# Altium PCB BOARD_4LAYER.PcbDoc (part 20 of 21)
Units mil, origin at the board's own origin, x right, y up, seen from the top; angles counter-clockwise.
Board outline 6692.91 x 10039.37 mil, 4 copper layers (Top Layer, Mid Layer 1, Mid Layer 2, Bottom Layer), stack 66.299 mil thick; 1532 components, 908 nets, 4105 pads, 1286 vias.
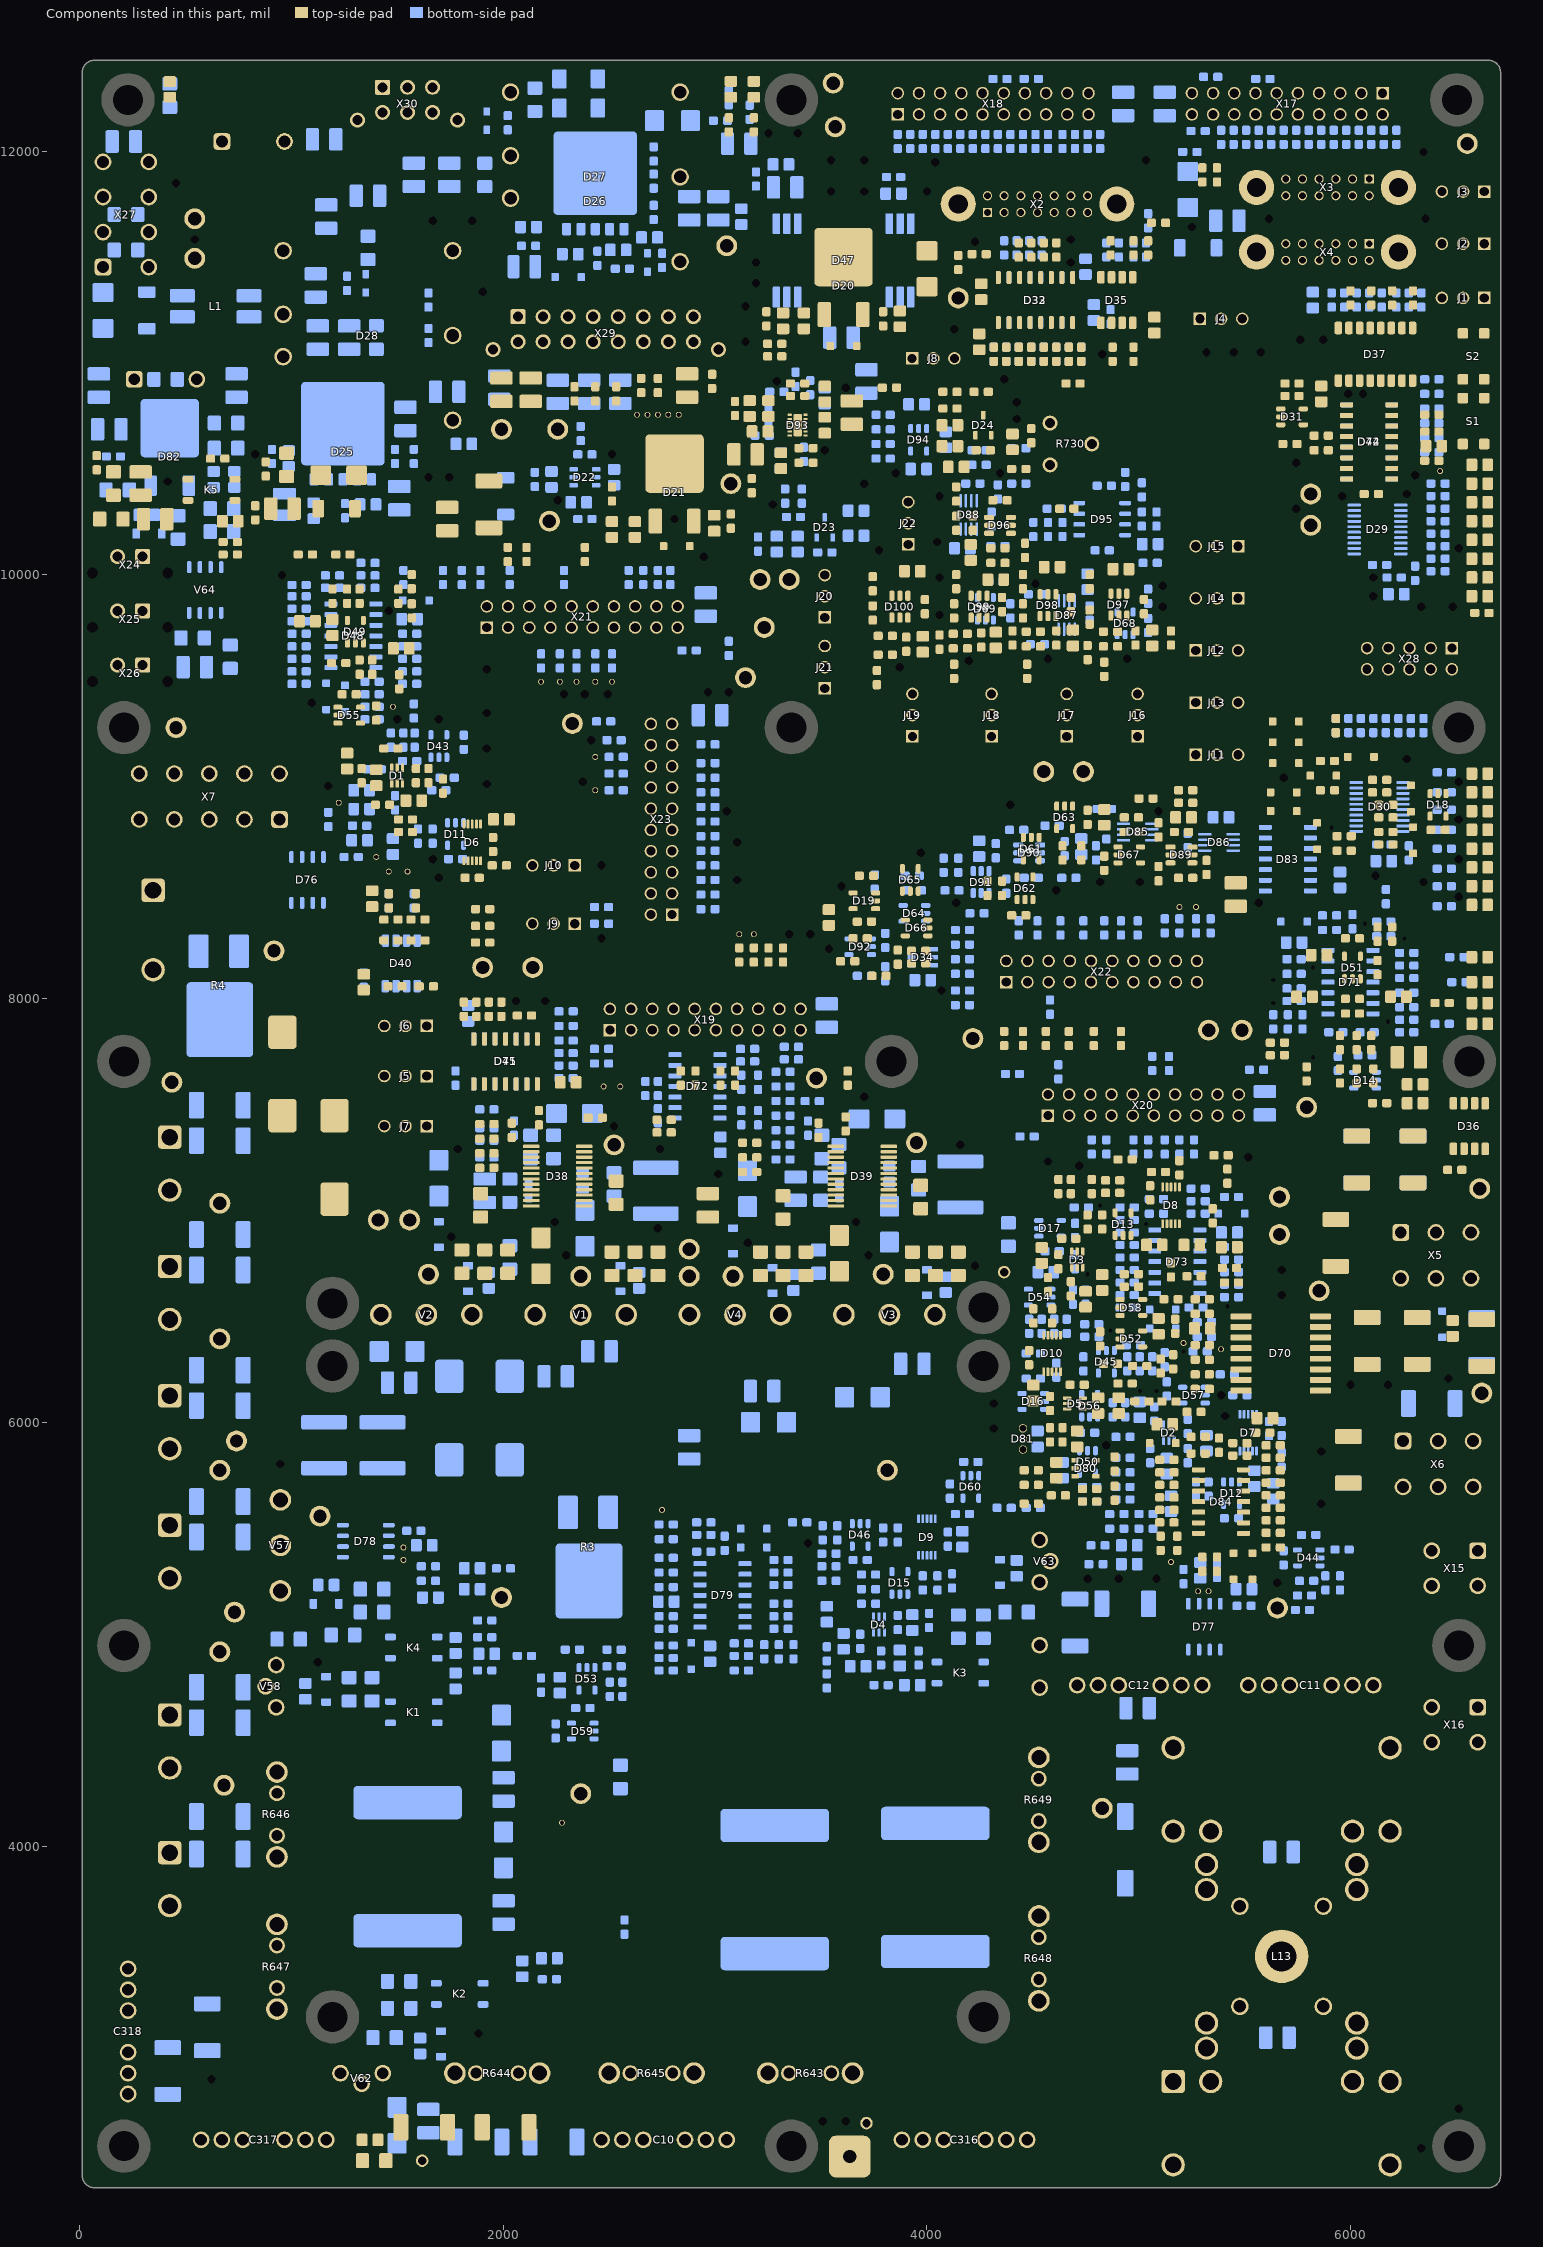
[diagram p22: the components of this part, seen from the top]

## Silkscreen, mask and mechanical layers (free items; w line width, h text height) (continued)
Drill Drawing:
  lines w4.72: 3.94,1657.48 4870.08,1657.48 ; 3.94,1846.46 4870.08,1846.46 ; 3.94,3.94 3.94,2035.43 4870.08,2035.43 4870.08,3.94 3.94,3.94
  text "A" at 375.98,12322.83 h78.74
  text "A" at 3127.95,12318.9 h78.74
  text "K" at 3557.09,12281.5 h78.74
  text "F" at 1431.1,12261.81 h78.74
  text "F" at 1549.21,12261.81 h78.74
  text "F" at 1667.32,12261.81 h78.74
  text "A" at 482.28,12255.91 h78.74
  text "A" at 3021.65,12251.97 h78.74
  text "J" at 2035.04,12238.58 h78.74
  text "J" at 2835.04,12238.58 h78.74
  text "E" at 3862.2,12233.86 h78.74
  text "E" at 3962.2,12233.86 h78.74
  text "E" at 4062.2,12233.86 h78.74
  text "E" at 4162.2,12233.86 h78.74
  text "E" at 4262.2,12233.86 h78.74
  text "E" at 4362.2,12233.86 h78.74
  text "E" at 4462.2,12233.86 h78.74
  text "E" at 4562.2,12233.86 h78.74
  text "E" at 4662.2,12233.86 h78.74
  text "E" at 4762.2,12233.86 h78.74
  text "E" at 5250,12233.86 h78.74
  text "E" at 5350,12233.86 h78.74
  text "E" at 5450,12233.86 h78.74
  text "E" at 5550,12233.86 h78.74
  text "E" at 5650,12233.86 h78.74
  text "E" at 5750,12233.86 h78.74
  text "E" at 5850,12233.86 h78.74
  text "E" at 5950,12233.86 h78.74
  text "E" at 6050,12233.86 h78.74
  text "E" at 6150,12233.86 h78.74
  text "A" at 3127.95,12208.66 h78.74
  text "P" at 230.31,12202.76 h78.74
  text "P" at 3360.24,12202.76 h78.74
  text "P" at 6500,12202.76 h78.74
  text "F" at 1431.1,12143.7 h78.74
  text "F" at 1549.21,12143.7 h78.74
  text "F" at 1667.32,12143.7 h78.74
  text "E" at 3862.2,12133.86 h78.74
  text "E" at 3962.2,12133.86 h78.74
  text "E" at 4062.2,12133.86 h78.74
  text "E" at 4162.2,12133.86 h78.74
  text "E" at 4262.2,12133.86 h78.74
  text "E" at 4362.2,12133.86 h78.74
  text "E" at 4462.2,12133.86 h78.74
  text "E" at 4562.2,12133.86 h78.74
  text "E" at 4662.2,12133.86 h78.74
  text "E" at 4762.2,12133.86 h78.74
  text "E" at 5250,12133.86 h78.74
  text "E" at 5350,12133.86 h78.74
  text "E" at 5450,12133.86 h78.74
  text "E" at 5550,12133.86 h78.74
  text "E" at 5650,12133.86 h78.74
  text "E" at 5750,12133.86 h78.74
  text "E" at 5850,12133.86 h78.74
  text "E" at 5950,12133.86 h78.74
  text "E" at 6050,12133.86 h78.74
  text "E" at 6150,12133.86 h78.74
  text "A" at 427.17,12110.24 h78.74
  text "F" at 1312.99,12106.69 h78.74
  text "F" at 1785.43,12106.69 h78.74
  text "A" at 6647.64,12098.43 h78.74
  text "K" at 3566.93,12074.8 h78.74
  text "A" at 899.61,12059.06 h78.74
  text "A" at 746.06,12055.12 h78.74
  text "A" at 6647.64,12051.18 h78.74
  text "T" at 3251.97,12045.28 h78.74
  text "T" at 3389.76,12045.28 h78.74
  text "A" at 2257.87,12035.43 h78.74
  text "A" at 2312.99,12035.43 h78.74
  text "A" at 2375.98,12035.43 h78.74
  text "A" at 2454.72,12035.43 h78.74
  text "A" at 2529.53,12035.43 h78.74
  text "A" at 2608.27,12035.43 h78.74
  text "H" at 673.23,12005.91 h78.74
  text "H" at 968.5,12005.91 h78.74
  text "K" at 6549.21,11996.06 h78.74
  text "A" at 2096.46,11976.38 h78.74
  text "A" at 899.61,11964.57 h78.74
  text "A" at 2257.87,11964.57 h78.74
  text "A" at 2312.99,11964.57 h78.74
  text "A" at 2375.98,11964.57 h78.74
  text "A" at 2454.72,11964.57 h78.74
  text "A" at 2529.53,11964.57 h78.74
  text "A" at 2608.27,11964.57 h78.74
  text "A" at 5316.93,11960.63 h78.74
  text "T" at 6342.52,11956.69 h78.74
  text "A" at 5923.23,11948.82 h78.74
  text "A" at 5978.35,11948.82 h78.74
  text "A" at 6037.4,11948.82 h78.74
  text "A" at 6096.46,11948.82 h78.74
  text "A" at 6155.51,11948.82 h78.74
  text "A" at 6214.57,11948.82 h78.74
  text "A" at 5391.73,11944.88 h78.74
  text "A" at 5450.79,11944.88 h78.74
  text "A" at 5509.84,11944.88 h78.74
  text "A" at 5564.96,11944.88 h78.74
  text "A" at 5624.02,11944.88 h78.74
  text "A" at 5742.13,11944.88 h78.74
  text "J" at 2035.04,11938.58 h78.74
  text "A" at 4698.82,11929.13 h78.74
  text "A" at 4816.93,11929.13 h78.74
  text "A" at 4525.59,11925.2 h78.74
  text "A" at 4643.7,11925.2 h78.74
  text "T" at 3547.24,11917.32 h78.74
  text "T" at 3704.72,11917.32 h78.74
  text "T" at 5033.46,11917.32 h78.74
  text "H" at 112.2,11909.45 h78.74
  text "H" at 328.74,11909.45 h78.74
  text "T" at 4039.37,11907.48 h78.74
  text "A" at 2096.46,11901.57 h78.74
  text "A" at 2257.87,11897.64 h78.74
  text "A" at 2312.99,11897.64 h78.74
  text "A" at 2375.98,11897.64 h78.74
  text "A" at 2454.72,11897.64 h78.74
  text "A" at 2529.53,11897.64 h78.74
  text "A" at 2608.27,11897.64 h78.74
  text "A" at 3399.61,11895.67 h78.74
  text "A" at 3005.91,11877.95 h78.74
  text "J" at 2835.04,11838.58 h78.74
  text "C" at 5692.91,11828.74 h78.74
  text "C" at 5771.65,11828.74 h78.74
  text "C" at 5850.39,11828.74 h78.74
  text "C" at 5929.13,11828.74 h78.74
  text "C" at 6007.87,11828.74 h78.74
  text "C" at 6086.61,11828.74 h78.74
  text "A" at 2903.54,11826.77 h78.74
  text "A" at 2257.87,11822.83 h78.74
  text "A" at 2312.99,11822.83 h78.74
  text "A" at 2375.98,11822.83 h78.74
  text "A" at 2454.72,11822.83 h78.74
  text "A" at 2529.53,11818.9 h78.74
  text "A" at 2608.27,11818.9 h78.74
  text "T" at 456.69,11809.06 h78.74
  text "N" at 5555.12,11789.37 h78.74
  text "N" at 6224.41,11789.37 h78.74
  text "A" at 2753.94,11787.4 h78.74
  text "A" at 2096.46,11775.59 h78.74
  text "A" at 3108.27,11775.59 h78.74
  text "A" at 5328.74,11771.65 h78.74
  text "A" at 5368.11,11771.65 h78.74
  text "T" at 3547.24,11769.68 h78.74
  text "T" at 3704.72,11769.68 h78.74
  text "T" at 4000,11769.68 h78.74
  text "E" at 6429.53,11769.68 h78.74
  text "E" at 6529.53,11769.68 h78.74
  text "E" at 6629.53,11769.68 h78.74
  text "A" at 2529.53,11751.97 h78.74
  text "A" at 2608.27,11751.97 h78.74
  text "C" at 4285.43,11750 h78.74
  text "C" at 4364.17,11750 h78.74
  text "C" at 4442.91,11750 h78.74
  text "C" at 4521.65,11750 h78.74
  text "C" at 4600.39,11750 h78.74
  text "C" at 4679.13,11750 h78.74
  text "C" at 4757.87,11750 h78.74
  text "C" at 5692.91,11750 h78.74
  text "C" at 5771.65,11750 h78.74
  text "C" at 5850.39,11750 h78.74
  text "C" at 5929.13,11750 h78.74
  text "C" at 6007.87,11750 h78.74
  text "C" at 6086.61,11750 h78.74
  text "A" at 2257.87,11748.03 h78.74
  text "A" at 2312.99,11748.03 h78.74
  text "A" at 2375.98,11748.03 h78.74
  text "A" at 2454.72,11748.03 h78.74
  text "H" at 112.2,11744.09 h78.74
  text "H" at 328.74,11744.09 h78.74
  text "J" at 2035.04,11738.58 h78.74
  text "N" at 4147.64,11710.63 h78.74
  text "N" at 4895.67,11710.63 h78.74
  text "A" at 5041.34,11708.66 h78.74
  text "A" at 2096.46,11704.72 h78.74
  text "A" at 3328.74,11700.79 h78.74
  text "A" at 3383.86,11700.79 h78.74
  text "A" at 2257.87,11677.17 h78.74
  text "A" at 2312.99,11677.17 h78.74
  text "A" at 2375.98,11677.17 h78.74
  text "A" at 2454.72,11677.17 h78.74
  text "A" at 2529.53,11677.17 h78.74
  text "A" at 2608.27,11677.17 h78.74
  text "C" at 4285.43,11671.26 h78.74
  text "C" at 4364.17,11671.26 h78.74
  text "C" at 4442.91,11671.26 h78.74
  text "C" at 4521.65,11671.26 h78.74
  text "C" at 4600.39,11671.26 h78.74
  text "C" at 4679.13,11671.26 h78.74
  text "C" at 4757.87,11671.26 h78.74
  text "A" at 5147.64,11661.42 h78.74
  text "K" at 545.28,11641.73 h78.74
  text "T" at 5614.17,11641.73 h78.74
  text "T" at 6352.36,11641.73 h78.74
  text "T" at 1667.32,11631.89 h78.74
  text "T" at 1854.33,11631.89 h78.74
  text "A" at 5309.06,11629.92 h78.74
  text "A" at 2750,11602.36 h78.74
  text "T" at 5250,11602.36 h78.74
  text "A" at 3490.16,11582.68 h78.74
  text "A" at 3545.28,11582.68 h78.74
  text "A" at 3608.27,11582.68 h78.74
  text "A" at 3667.32,11582.68 h78.74
  text "A" at 3726.38,11582.68 h78.74
  text "H" at 112.2,11578.74 h78.74
  text "H" at 328.74,11578.74 h78.74
  text "A" at 5084.65,11574.8 h78.74
  text "A" at 4931.1,11570.87 h78.74
  text "A" at 2041.34,11547.24 h78.74
  text "T" at 545.28,11543.31 h78.74
  text "T" at 4679.13,11543.31 h78.74
  text "A" at 2438.98,11535.43 h78.74
  text "T" at 4226.38,11533.46 h78.74
  text "A" at 3490.16,11531.5 h78.74
  text "A" at 3545.28,11531.5 h78.74
  text "A" at 3608.27,11531.5 h78.74
  text "A" at 3667.32,11531.5 h78.74
  text "A" at 3726.38,11531.5 h78.74
  text "A" at 4805.12,11531.5 h78.74
  text "C" at 5692.91,11523.62 h78.74
  text "C" at 5771.65,11523.62 h78.74
  text "C" at 5850.39,11523.62 h78.74
  text "C" at 5929.13,11523.62 h78.74
  text "C" at 6007.87,11523.62 h78.74
  text "C" at 6086.61,11523.62 h78.74
  text "E" at 6429.53,11523.62 h78.74
  text "E" at 6529.53,11523.62 h78.74
  text "E" at 6629.53,11523.62 h78.74
  text "K" at 3055.12,11513.78 h78.74
  text "A" at 4750,11507.87 h78.74
  text "J" at 962.2,11490.55 h78.74
  text "J" at 1762.2,11490.55 h78.74
  text "A" at 3490.16,11484.25 h78.74
  text "A" at 3545.28,11484.25 h78.74
  text "A" at 3608.27,11484.25 h78.74
  text "A" at 3667.32,11484.25 h78.74
  text "A" at 3726.38,11484.25 h78.74
  text "N" at 5555.12,11484.25 h78.74
  text "N" at 6224.41,11484.25 h78.74
  text "A" at 5084.65,11468.5 h78.74
  text "K" at 545.28,11454.72 h78.74
  text "C" at 5692.91,11444.88 h78.74
  text "C" at 5771.65,11444.88 h78.74
  text "C" at 5850.39,11444.88 h78.74
  text "C" at 5929.13,11444.88 h78.74
  text "C" at 6007.87,11444.88 h78.74
  text "C" at 6086.61,11444.88 h78.74
  text "J" at 2835.04,11438.58 h78.74
  text "A" at 3490.16,11437.01 h78.74
  text "A" at 3545.28,11437.01 h78.74
  text "A" at 3608.27,11437.01 h78.74
  text "A" at 3667.32,11437.01 h78.74
  text "A" at 3726.38,11437.01 h78.74
  text "T" at 3192.91,11435.04 h78.74
  text "T" at 4679.13,11435.04 h78.74
  text "A" at 4868.11,11417.32 h78.74
  text "A" at 4970.47,11417.32 h78.74
  text "H" at 112.2,11413.39 h78.74
  text "H" at 328.74,11413.39 h78.74
  text "A" at 1998.03,11413.39 h78.74
  text "A" at 4364.17,11413.39 h78.74
  text "A" at 781.5,11409.45 h78.74
  text "A" at 828.74,11409.45 h78.74
  text "A" at 4190.94,11405.51 h78.74
  text "A" at 3490.16,11389.76 h78.74
  text "A" at 3545.28,11389.76 h78.74
  text "A" at 3608.27,11389.76 h78.74
  text "A" at 3667.32,11389.76 h78.74
  text "A" at 3726.38,11389.76 h78.74
  text "A" at 781.5,11370.08 h78.74
  text "A" at 828.74,11370.08 h78.74
  text "A" at 2635.83,11370.08 h78.74
  text "A" at 2750,11366.14 h78.74
  text "A" at 1958.66,11354.33 h78.74
  text "A" at 6293.31,11346.46 h78.74
  text "A" at 5950.79,11342.52 h78.74
  text "A" at 6049.21,11342.52 h78.74
  text "A" at 6143.7,11342.52 h78.74
  text "A" at 6238.19,11342.52 h78.74
  text "A" at 3490.16,11338.58 h78.74
  text "A" at 3545.28,11338.58 h78.74
  text "A" at 3608.27,11338.58 h78.74
  text "A" at 3667.32,11338.58 h78.74
  text "A" at 3726.38,11338.58 h78.74
  text "T" at 3192.91,11336.61 h78.74
  text "A" at 80.71,11322.83 h78.74
  text "A" at 143.7,11322.83 h78.74
  text "A" at 2242.13,11318.9 h78.74
  text "A" at 4344.49,11311.02 h78.74
  text "A" at 4635.83,11311.02 h78.74
  text "T" at 1903.54,11297.24 h78.74
  text "A" at 112.2,11295.28 h78.74
  text "K" at 4147.64,11267.72 h78.74
  text "E" at 6429.53,11267.72 h78.74
  text "E" at 6529.53,11267.72 h78.74
  text "E" at 6629.53,11267.72 h78.74
  text "A" at 80.71,11263.78 h78.74
  text "A" at 143.7,11263.78 h78.74
  text "A" at 1029.53,11228.35 h78.74
  text "T" at 3143.7,11228.35 h78.74
  text "A" at 4253.94,11212.6 h78.74
  text "A" at 4718.5,11204.72 h78.74
  text "J" at 962.2,11190.55 h78.74
  text "A" at 5994.09,11181.1 h78.74
  text "A" at 6092.52,11181.1 h78.74
  text "A" at 6194.88,11181.1 h78.74
  text "A" at 6289.37,11181.1 h78.74
  text "F" at 2070.87,11179.13 h78.74
  text "F" at 2188.98,11179.13 h78.74
  text "F" at 2307.09,11179.13 h78.74
  text "F" at 2425.2,11179.13 h78.74
  text "F" at 2543.31,11179.13 h78.74
  text "F" at 2661.42,11179.13 h78.74
  text "F" at 2779.53,11179.13 h78.74
  text "F" at 2897.64,11179.13 h78.74
  text "A" at 5820.87,11173.23 h78.74
  text "E" at 5287.8,11169.29 h78.74
  text "E" at 5387.8,11169.29 h78.74
  text "E" at 5487.8,11169.29 h78.74
  text "A" at 80.71,11149.61 h78.74
  text "A" at 143.7,11149.61 h78.74
  text "A" at 1029.53,11145.67 h78.74
  text "A" at 6627.95,11145.67 h78.74
  text "A" at 112.2,11122.05 h78.74
  text "T" at 4127.95,11120.08 h78.74
  text "A" at 4360.24,11102.36 h78.74
  text "A" at 4824.8,11098.43 h78.74
  text "A" at 4927.17,11098.43 h78.74
  text "A" at 80.71,11094.49 h78.74
  text "A" at 143.7,11094.49 h78.74
  text "A" at 3246.06,11094.49 h78.74
  text "A" at 3824.8,11094.49 h78.74
  text "J" at 1762.2,11090.55 h78.74
  text "A" at 3374.02,11082.68 h78.74
  text "T" at 5761.81,11070.87 h78.74
  text "T" at 5870.08,11070.87 h78.74
  text "F" at 2070.87,11061.02 h78.74
  text "F" at 2188.98,11061.02 h78.74
  text "F" at 2307.09,11061.02 h78.74
  text "F" at 2425.2,11061.02 h78.74
  text "F" at 2543.31,11061.02 h78.74
  text "F" at 2661.42,11061.02 h78.74
  text "F" at 2779.53,11061.02 h78.74
  text "F" at 2897.64,11061.02 h78.74
  text "T" at 3143.7,11061.02 h78.74
  text "A" at 5068.9,11051.18 h78.74
  text "A" at 1029.53,11031.5 h78.74
  text "F" at 1952.76,11024.02 h78.74
  text "F" at 3015.75,11024.02 h78.74
  text "T" at 5318.9,11011.81 h78.74
  text "T" at 5446.85,11011.81 h78.74
  text "T" at 5574.8,11011.81 h78.74
  text "A" at 6088.58,11007.87 h78.74
  text "A" at 6454.72,11007.87 h78.74
  text "T" at 4826.77,11001.97 h78.74
  text "J" at 962.2,10990.55 h78.74
  text "E" at 3929.53,10982.28 h78.74
  text "E" at 4029.53,10982.28 h78.74
  text "E" at 4129.53,10982.28 h78.74
  text "A" at 4246.06,10968.5 h78.74
  text "A" at 1029.53,10956.69 h78.74
  text "A" at 5938.98,10933.07 h78.74
  text "A" at 6037.4,10933.07 h78.74
  text "A" at 6139.76,10933.07 h78.74
  text "A" at 6238.19,10933.07 h78.74
  text "A" at 4403.54,10929.13 h78.74
  text "A" at 4643.7,10929.13 h78.74
  text "A" at 4273.62,10925.2 h78.74
  text "A" at 4312.99,10925.2 h78.74
  text "A" at 4446.85,10925.2 h78.74
  text "A" at 4541.34,10925.2 h78.74
  text "A" at 4588.58,10925.2 h78.74
  text "A" at 4730.31,10925.2 h78.74
  text "A" at 4773.62,10925.2 h78.74
  text "A" at 4883.86,10925.2 h78.74
  text "A" at 4974.41,10925.2 h78.74
  text "A" at 620.08,10921.26 h78.74
  text "A" at 4564.96,10893.7 h78.74
  text "H" at 259.84,10883.86 h78.74
  text "H" at 555.12,10883.86 h78.74
  text "T" at 4364.17,10883.86 h78.74
  text "T" at 3291.34,10874.02 h78.74
  text "A" at 3911.42,10874.02 h78.74
  text "A" at 1068.9,10854.33 h78.74
  text "A" at 1131.89,10854.33 h78.74
  text "A" at 1206.69,10854.33 h78.74
  text "A" at 1285.43,10854.33 h78.74
  text "A" at 1360.24,10854.33 h78.74
  text "A" at 1423.23,10854.33 h78.74
  text "A" at 3568.9,10850.39 h78.74
  text "A" at 620.08,10846.46 h78.74
  text "T" at 3616.14,10844.49 h78.74
  text "A" at 6592.52,10838.58 h78.74
  text "A" at 6490.16,10834.65 h78.74
  text "A" at 3206.69,10830.71 h78.74
  text "A" at 4025.59,10830.71 h78.74
  text "A" at 3092.52,10826.77 h78.74
  text "A" at 1848.43,10818.9 h78.74
  text "T" at 5988.19,10814.96 h78.74
  text "T" at 6057.09,10814.96 h78.74
  text "A" at 1068.9,10799.21 h78.74
  text "A" at 1131.89,10799.21 h78.74
  text "A" at 1206.69,10799.21 h78.74
  text "A" at 1285.43,10799.21 h78.74
  text "A" at 1360.24,10799.21 h78.74
  text "A" at 1423.23,10799.21 h78.74
  text "A" at 5938.98,10795.28 h78.74
  text "A" at 6192.91,10795.28 h78.74
  text "T" at 4423.23,10775.59 h78.74
  text "A" at 4698.82,10775.59 h78.74
  text "A" at 6454.72,10775.59 h78.74
  text "A" at 305.12,10771.65 h78.74
  text "A" at 364.17,10771.65 h78.74
  text "A" at 431.1,10771.65 h78.74
  text "A" at 490.16,10771.65 h78.74
  text "A" at 549.21,10771.65 h78.74
  text "A" at 3391.73,10765.75 h78.74
  text "A" at 6135.83,10763.78 h78.74
  text "A" at 3352.36,10748.03 h78.74
  text "A" at 3427.17,10748.03 h78.74
  text "A" at 742.13,10744.09 h78.74
  text "A" at 1068.9,10740.16 h78.74
  text "A" at 1131.89,10740.16 h78.74
  text "A" at 1206.69,10740.16 h78.74
  text "A" at 1285.43,10740.16 h78.74
  text "A" at 1360.24,10740.16 h78.74
  text "A" at 1423.23,10740.16 h78.74
  text "A" at 5824.8,10732.28 h78.74
  text "A" at 6037.4,10732.28 h78.74
  text "A" at 3462.6,10728.35 h78.74
  text "A" at 305.12,10716.54 h78.74
  text "A" at 364.17,10716.54 h78.74
  text "A" at 431.1,10716.54 h78.74
  text "A" at 490.16,10716.54 h78.74
  text "A" at 549.21,10716.54 h78.74
  text "B" at 2631.89,10716.54 h78.74
  text "B" at 2681.1,10716.54 h78.74
  text "B" at 2730.32,10716.54 h78.74
  text "B" at 2779.53,10716.54 h78.74
  text "B" at 2828.74,10716.54 h78.74
  text "A" at 3872.05,10716.54 h78.74
  text "A" at 6244.09,10716.54 h78.74
  text "A" at 3387.8,10708.66 h78.74
  text "A" at 3994.09,10704.72 h78.74
  text "A" at 3312.99,10696.85 h78.74
  text "T" at 4423.23,10696.85 h78.74
  text "J" at 1762.2,10690.55 h78.74
  text "A" at 1068.9,10681.1 h78.74
  text "A" at 1131.89,10681.1 h78.74
  text "A" at 1206.69,10681.1 h78.74
  text "A" at 1285.43,10681.1 h78.74
  text "A" at 1360.24,10681.1 h78.74
  text "A" at 1423.23,10681.1 h78.74
  text "F" at 4580.71,10677.17 h78.74
  text "A" at 6458.66,10677.17 h78.74
  text "A" at 3387.8,10669.29 h78.74
  text "A" at 305.12,10661.42 h78.74
  text "A" at 364.17,10661.42 h78.74
  text "A" at 431.1,10661.42 h78.74
  text "A" at 490.16,10661.42 h78.74
  text "A" at 549.21,10661.42 h78.74
  text "A" at 3320.87,10657.48 h78.74
  text "A" at 5824.8,10657.48 h78.74
  text "K" at 1992.13,10647.64 h78.74
  text "K" at 2257.87,10647.64 h78.74
  text "A" at 3127.95,10637.8 h78.74
  text "A" at 3458.66,10637.8 h78.74
  text "A" at 5631.89,10629.92 h78.74
  text "A" at 5671.26,10629.92 h78.74
  text "A" at 3387.8,10625.98 h78.74
  text "A" at 6250,10625.98 h78.74
  text "A" at 6624.02,10625.98 h78.74
  text "A" at 1068.9,10618.11 h78.74
  text "A" at 1135.83,10618.11 h78.74
  text "A" at 1206.69,10618.11 h78.74
  text "A" at 1285.43,10618.11 h78.74
  text "A" at 1360.24,10618.11 h78.74
  text "A" at 1423.23,10618.11 h78.74
  text "A" at 4344.49,10618.11 h78.74
  text "A" at 2690.94,10606.3 h78.74
  text "A" at 2750,10606.3 h78.74
  text "A" at 2816.93,10606.3 h78.74
  text "A" at 2875.98,10606.3 h78.74
  text "A" at 2931.1,10606.3 h78.74
  text "A" at 946.85,10602.36 h78.74
  text "A" at 305.12,10598.43 h78.74
  text "A" at 364.17,10598.43 h78.74
  text "A" at 431.1,10598.43 h78.74
  text "A" at 490.16,10598.43 h78.74
  text "A" at 549.21,10598.43 h78.74
  text "A" at 1903.54,10582.68 h78.74
  text "A" at 3312.99,10582.68 h78.74
  text "A" at 3872.05,10582.68 h78.74
  text "F" at 4777.56,10578.74 h78.74
  text "A" at 6474.41,10566.93 h78.74
  text "A" at 198.82,10562.99 h78.74
  text "A" at 2690.94,10559.06 h78.74
  text "A" at 2750,10559.06 h78.74
  text "A" at 2816.93,10559.06 h78.74
  text "A" at 2875.98,10559.06 h78.74
  text "A" at 2931.1,10559.06 h78.74
  text "A" at 6289.37,10559.06 h78.74
  text "A" at 1068.9,10555.12 h78.74
  text "A" at 1135.83,10555.12 h78.74
  text "A" at 1206.69,10555.12 h78.74
  text "A" at 1285.43,10555.12 h78.74
  text "A" at 1360.24,10555.12 h78.74
  text "A" at 1423.23,10555.12 h78.74
  text "T" at 3517.72,10549.21 h78.74
  text "A" at 305.12,10535.43 h78.74
  text "A" at 364.17,10535.43 h78.74
  text "A" at 431.1,10535.43 h78.74
  text "A" at 490.16,10535.43 h78.74
  text "A" at 549.21,10535.43 h78.74
  text "T" at 830.71,10529.53 h78.74
  text "T" at 2513.78,10529.53 h78.74
  text "A" at 2690.94,10507.87 h78.74
  text "A" at 2750,10507.87 h78.74
  text "A" at 2816.93,10507.87 h78.74
  text "A" at 2875.98,10507.87 h78.74
  text "A" at 2931.1,10507.87 h78.74
  text "A" at 4041.34,10503.94 h78.74
  text "A" at 738.19,10500 h78.74
  text "A" at 1068.9,10500 h78.74
  text "A" at 1135.83,10500 h78.74
  text "A" at 1206.69,10500 h78.74
  text "A" at 1285.43,10500 h78.74
  text "A" at 1360.24,10500 h78.74
  text "A" at 1423.23,10500 h78.74
  text "A" at 4360.24,10500 h78.74
  text "A" at 6474.41,10500 h78.74
  text "T" at 5742.13,10490.16 h78.74
  text "F" at 4580.71,10480.32 h78.74
  text "A" at 6517.72,10480.32 h78.74
  text "A" at 6246.06,10464.57 h78.74
  text "A" at 2690.94,10456.69 h78.74
  text "A" at 2750,10456.69 h78.74
  text "A" at 2816.93,10456.69 h78.74
  text "A" at 2875.98,10456.69 h78.74
  text "A" at 2931.1,10456.69 h78.74
  text "B" at 6421.26,10450.79 h78.74
  text "A" at 5013.78,10444.88 h78.74
  text "T" at 3852.36,10440.94 h78.74
  text "T" at 4344.49,10440.94 h78.74
  text "A" at 1494.09,10437.01 h78.74
  text "A" at 2076.77,10437.01 h78.74
  text "T" at 6303.15,10431.1 h78.74
  text "T" at 1647.64,10421.26 h78.74
  text "T" at 1746.06,10421.26 h78.74
  text "A" at 2289.37,10417.32 h78.74
  text "A" at 3309.06,10413.39 h78.74
  text "A" at 797.24,10409.45 h78.74
  text "A" at 2690.94,10409.45 h78.74
  text "A" at 2750,10409.45 h78.74
  text "A" at 2816.93,10409.45 h78.74
  text "A" at 2875.98,10409.45 h78.74
  text "A" at 2931.1,10409.45 h78.74
  text "A" at 3407.48,10409.45 h78.74
  text "T" at 417.32,10401.57 h78.74
  text "A" at 6517.72,10393.7 h78.74
  text "K" at 3074.8,10391.73 h78.74
  text "T" at 3704.72,10391.73 h78.74
  text "A" at 3608.27,10381.89 h78.74
  text "A" at 4088.58,10377.95 h78.74
  text "A" at 6194.88,10377.95 h78.74
  text "A" at 2690.94,10362.2 h78.74
  text "A" at 2750,10362.2 h78.74
  text "A" at 2816.93,10362.2 h78.74
  text "A" at 2875.98,10362.2 h78.74
  text "A" at 2931.1,10362.2 h78.74
  text "A" at 1053.15,10358.27 h78.74
  text "A" at 1179.13,10358.27 h78.74
  text "A" at 1242.13,10358.27 h78.74
  text "A" at 1312.99,10358.27 h78.74
  text "A" at 4738.19,10350.39 h78.74
  text "A" at 4466.54,10346.46 h78.74
  text "K" at 5811.02,10342.52 h78.74
  text "T" at 6263.78,10342.52 h78.74
  text "T" at 4059.06,10332.68 h78.74
  text "T" at 5958.66,10332.68 h78.74
  text "A" at 2187.01,10326.77 h78.74
  text "A" at 4269.69,10326.77 h78.74
  text "A" at 4659.45,10326.77 h78.74
  text "A" at 4797.24,10322.83 h78.74
  text "A" at 6013.78,10318.9 h78.74
  text "T" at 2257.87,10312.99 h78.74
  text "A" at 781.5,10311.02 h78.74
  text "A" at 4419.29,10311.02 h78.74
  text "E" at 3911.42,10304.72 h78.74
  text "A" at 6517.72,10303.15 h78.74
  text "A" at 3171.26,10299.21 h78.74
  text "A" at 3576.77,10299.21 h78.74
  text "T" at 3271.65,10293.31 h78.74
  text "T" at 5742.13,10273.62 h78.74
  text "A" at 2631.89,10267.72 h78.74
  text "A" at 5962.6,10263.78 h78.74
  text "A" at 2462.6,10261.81 h78.74
  text "A" at 4525.59,10251.97 h78.74
  text "T" at 2809.06,10224.41 h78.74
  text "A" at 6517.72,10216.54 h78.74
  text "K" at 2218.5,10214.57 h78.74
  text "A" at 3742.13,10204.72 h78.74
  text "E" at 3911.42,10204.72 h78.74
  text "A" at 4446.85,10196.85 h78.74
  text "K" at 5811.02,10194.88 h78.74
  text "A" at 3340.55,10181.1 h78.74
  text "A" at 828.74,10173.23 h78.74
  text "A" at 3049.21,10133.86 h78.74
  text "A" at 3446.85,10133.86 h78.74
  text "A" at 6517.72,10133.86 h78.74
  text "A" at 4265.75,10125.98 h78.74
  text "A" at 809.06,10122.05 h78.74
  text "T" at 4049.21,10116.14 h78.74
  text "E" at 3911.42,10104.72 h78.74
  text "A" at 1462.6,10098.43 h78.74
  text "A" at 2572.83,10098.43 h78.74
  text "E" at 5268.11,10096.46 h78.74
  text "E" at 5368.11,10096.46 h78.74
  text "E" at 5468.11,10096.46 h78.74
  text "T" at 6509.84,10086.61 h78.74
  text "A" at 809.06,10078.74 h78.74
  text "A" at 1498.03,10078.74 h78.74
  text "A" at 1718.5,10078.74 h78.74
  text "A" at 1895.67,10078.74 h78.74
  text "T" at 3773.62,10076.77 h78.74
  text "A" at 3159.45,10074.8 h78.74
  text "A" at 5127.95,10055.12 h78.74
  text "A" at 4261.81,10051.18 h78.74
  text "F" at 181.1,10047.24 h78.74
  text "F" at 299.21,10047.24 h78.74
  text "T" at 2946.85,10047.24 h78.74
  text "A" at 6517.72,10035.43 h78.74
  text "A" at 1805.12,10027.56 h78.74
  text "A" at 2285.43,10027.56 h78.74
  text "A" at 2612.2,10027.56 h78.74
  text "A" at 2730.32,10027.56 h78.74
  text "A" at 2564.96,10023.62 h78.74
  text "A" at 2663.39,10023.62 h78.74
  text "A" at 4415.35,10019.68 h78.74
  text "A" at 6222.44,10019.68 h78.74
  text "A" at 3742.13,10011.81 h78.74
  text "A" at 5576.77,10007.87 h78.74
  text "A" at 4253.94,9992.13 h78.74
  text "A" at 1438.98,9984.25 h78.74
  text "A" at 4407.48,9980.32 h78.74
  text "A" at 3824.8,9972.44 h78.74
  text "A" at 4498.03,9972.44 h78.74
  text "U" at 62.99,9970.08 h78.74
  text "U" at 417.32,9970.08 h78.74
  text "A" at 1982.28,9968.5 h78.74
  text "A" at 4814.96,9964.57 h78.74
  text "A" at 4179.13,9960.63 h78.74
  text "E" at 3517.72,9960.24 h78.74
  text "T" at 956.69,9958.66 h78.74
  text "T" at 4059.06,9948.82 h78.74
  text "T" at 6106.3,9948.82 h78.74
  text "A" at 6517.72,9948.82 h78.74
  text "A" at 1438.98,9940.94 h78.74
  text "K" at 3212.6,9938.98 h78.74
  text "K" at 3350.39,9938.98 h78.74
  text "A" at 1273.62,9937.01 h78.74
  text "A" at 6348.43,9937.01 h78.74
  text "A" at 470.47,9925.2 h78.74
  text "A" at 513.78,9925.2 h78.74
  text "A" at 561.02,9925.2 h78.74
  text "A" at 604.33,9925.2 h78.74
  text "A" at 4883.86,9925.2 h78.74
  text "T" at 4511.81,9919.29 h78.74
  text "A" at 4568.9,9918.5 h78.74
  text "A" at 3864.17,9913.39 h78.74
  text "A" at 4234.25,9913.39 h78.74
  text "T" at 5112.2,9909.45 h78.74
  text "A" at 6458.66,9901.57 h78.74
  text "A" at 4998.03,9893.7 h78.74
  text "A" at 6517.72,9862.2 h78.74
  text "E" at 3517.72,9860.24 h78.74
  text "T" at 6106.3,9860.24 h78.74
  text "A" at 958.66,9858.27 h78.74
  text "A" at 6458.66,9858.27 h78.74
  text "E" at 5268.11,9850.39 h78.74
  text "E" at 5368.11,9850.39 h78.74
  text "E" at 5468.11,9850.39 h78.74
  text "A" at 450.79,9842.52 h78.74
  text "A" at 494.09,9842.52 h78.74
  text "A" at 537.4,9842.52 h78.74
  text "A" at 580.71,9842.52 h78.74
  text "A" at 624.02,9842.52 h78.74
  text "A" at 667.32,9842.52 h78.74
  text "A" at 4812.99,9834.65 h78.74
  text "A" at 4167.32,9826.77 h78.74
  text "A" at 3785.43,9818.9 h78.74
  text "A" at 4494.09,9818.9 h78.74
  text "E" at 1923.23,9812.6 h78.74
  text "E" at 2023.23,9812.6 h78.74
  text "E" at 2123.23,9812.6 h78.74
  text "E" at 2223.23,9812.6 h78.74
  text "E" at 2323.23,9812.6 h78.74
  text "E" at 2423.23,9812.6 h78.74
  text "E" at 2523.23,9812.6 h78.74
  text "E" at 2623.23,9812.6 h78.74
  text "E" at 2723.23,9812.6 h78.74
  text "E" at 2823.23,9812.6 h78.74
  text "T" at 5112.2,9811.02 h78.74
  text "T" at 6332.68,9811.02 h78.74
  text "T" at 6480.31,9811.02 h78.74
  text "A" at 958.66,9803.15 h78.74
  text "A" at 4812.99,9795.28 h78.74
  text "F" at 181.1,9791.34 h78.74
  text "F" at 299.21,9791.34 h78.74
  text "T" at 1460.63,9791.34 h78.74
  text "A" at 1643.7,9791.34 h78.74
  text "A" at 6541.34,9783.46 h78.74
  text "A" at 1289.37,9779.53 h78.74
  text "T" at 4059.06,9771.65 h78.74
  text "E" at 3517.72,9760.24 h78.74
  text "A" at 4643.7,9755.91 h78.74
  text "A" at 4163.39,9724.41 h78.74
  text "A" at 5769.69,9720.47 h78.74
  text "A" at 6005.91,9720.47 h78.74
  text "A" at 6159.45,9716.54 h78.74
  text "A" at 6206.69,9716.54 h78.74
  text "U" at 62.99,9714.17 h78.74
  text "U" at 417.32,9714.17 h78.74
  text "A" at 962.6,9712.6 h78.74
  text "E" at 1923.23,9712.6 h78.74
  text "E" at 2023.23,9712.6 h78.74
  text "E" at 2123.23,9712.6 h78.74
  text "E" at 2223.23,9712.6 h78.74
  text "E" at 2323.23,9712.6 h78.74
  text "E" at 2423.23,9712.6 h78.74
  text "E" at 2523.23,9712.6 h78.74
  text "E" at 2623.23,9712.6 h78.74
  text "E" at 2723.23,9712.6 h78.74
  text "E" at 2823.23,9712.6 h78.74
  text "K" at 3232.28,9712.6 h78.74
  text "A" at 1250,9696.85 h78.74
  text "A" at 1124.02,9685.04 h78.74
  text "A" at 1454.72,9663.39 h78.74
  text "A" at 651.57,9661.42 h78.74
  text "A" at 4793.31,9657.48 h78.74
  text "A" at 1627.95,9653.54 h78.74
  text "A" at 1797.24,9649.61 h78.74
  text "A" at 4942.91,9629.92 h78.74
  text "E" at 3517.72,9625.59 h78.74
  text "A" at 958.66,9622.05 h78.74
  text "E" at 6076.77,9615.75 h78.74
  text "E" at 6176.77,9615.75 h78.74
  text "E" at 6276.77,9615.75 h78.74
  text "E" at 6376.77,9615.75 h78.74
  text "E" at 6476.77,9615.75 h78.74
  text "E" at 5268.11,9604.33 h78.74
  text "E" at 5368.11,9604.33 h78.74
  text "E" at 5468.11,9604.33 h78.74
  text "A" at 651.57,9602.36 h78.74
  text "A" at 4643.7,9586.61 h78.74
  text "A" at 3108.27,9582.68 h78.74
  text "A" at 5017.72,9582.68 h78.74
  text "A" at 4277.56,9574.8 h78.74
  text "T" at 4570.87,9564.96 h78.74
  text "T" at 4944.88,9564.96 h78.74
  text "A" at 375.98,9562.99 h78.74
  text "A" at 3927.17,9559.06 h78.74
  text "T" at 4196.85,9555.12 h78.74
  text "F" at 181.1,9535.43 h78.74
  text "F" at 299.21,9535.43 h78.74
  text "A" at 1631.89,9535.43 h78.74
  text "E" at 3517.72,9525.59 h78.74
  text "T" at 3872.05,9525.59 h78.74
  text "T" at 1923.23,9515.75 h78.74
  text "E" at 6076.77,9515.75 h78.74
  text "E" at 6176.77,9515.75 h78.74
  text "E" at 6276.77,9515.75 h78.74
  text "E" at 6376.77,9515.75 h78.74
  text "E" at 6476.77,9515.75 h78.74
  text "A" at 375.98,9503.94 h78.74
  text "A" at 1253.94,9496.06 h78.74
  text "A" at 1462.6,9494.09 h78.74
  text "A" at 946.85,9476.38 h78.74
  text "K" at 3143.7,9476.38 h78.74
  text "A" at 4285.43,9468.5 h78.74
  text "U" at 62.99,9458.27 h78.74
  text "U" at 417.32,9458.27 h78.74
  text "B" at 2179.13,9456.69 h78.74
  text "B" at 2267.72,9456.69 h78.74
  text "B" at 2346.46,9456.69 h78.74
  text "B" at 2435.04,9456.69 h78.74
  text "B" at 2513.78,9456.69 h78.74
  text "A" at 1301.18,9448.82 h78.74
  text "E" at 3517.72,9425.59 h78.74
  text "A" at 6316.93,9409.45 h78.74
  text "T" at 2966.54,9407.48 h78.74
  text "T" at 3064.96,9407.48 h78.74
  text "A" at 1001.97,9405.51 h78.74
  text "A" at 5663.39,9405.51 h78.74
  text "A" at 6064.96,9405.51 h78.74
  text "A" at 6143.7,9405.51 h78.74
  text "E" at 3931.1,9399.21 h78.74
  text "E" at 4305.12,9399.21 h78.74
  text "E" at 4659.45,9399.21 h78.74
  text "E" at 4994.09,9399.21 h78.74
  text "T" at 2287.4,9397.64 h78.74
  text "T" at 2385.83,9397.64 h78.74
  text "T" at 2494.09,9397.64 h78.74
  text "A" at 57.09,9389.76 h78.74
  text "A" at 104.33,9389.76 h78.74
  text "A" at 1462.6,9385.83 h78.74
  text "A" at 2183.07,9366.14 h78.74
  text "T" at 1096.46,9358.27 h78.74
  text "E" at 5268.11,9358.27 h78.74
  text "E" at 5368.11,9358.27 h78.74
  text "E" at 5468.11,9358.27 h78.74
  text "A" at 3769.68,9354.33 h78.74
  text "B" at 1480.32,9338.58 h78.74
  text "T" at 1923.23,9309.06 h78.74
  text "A" at 2183.07,9307.09 h78.74
  text "E" at 3931.1,9299.21 h78.74
  text "E" at 4305.12,9299.21 h78.74
  text "E" at 4659.45,9299.21 h78.74
  text "E" at 4994.09,9299.21 h78.74
  text "T" at 1500,9279.53 h78.74
  text "T" at 1696.85,9279.53 h78.74
  text "A" at 1179.13,9275.59 h78.74
  text "K" at 2326.77,9259.84 h78.74
  text "E" at 2697.24,9257.87 h78.74
  text "E" at 2797.24,9257.87 h78.74
  text "P" at 210.63,9240.16 h78.74
  text "K" at 456.69,9240.16 h78.74
  text "P" at 3360.24,9240.16 h78.74
  text "P" at 6509.84,9240.16 h78.74
  text "A" at 1403.54,9228.35 h78.74
  text "A" at 1324.8,9212.6 h78.74
  text "A" at 1769.68,9208.66 h78.74
  text "E" at 3931.1,9199.21 h78.74
  text "E" at 4305.12,9199.21 h78.74
  text "E" at 4659.45,9199.21 h78.74
  text "E" at 4994.09,9199.21 h78.74
  text "T" at 2415.35,9181.1 h78.74
  text "A" at 6316.93,9161.42 h78.74
  text "E" at 2697.24,9157.87 h78.74
  text "E" at 2797.24,9157.87 h78.74
  text "A" at 1324.8,9153.54 h78.74
  text "T" at 1923.23,9141.73 h78.74
  text "A" at 3001.97,9118.11 h78.74
  text "E" at 5268.11,9112.2 h78.74
  text "E" at 5368.11,9112.2 h78.74
  text "E" at 5468.11,9112.2 h78.74
  text "B" at 2435.04,9102.36 h78.74
  text "A" at 1814.96,9094.49 h78.74
  text "T" at 6263.78,9092.52 h78.74
  text "A" at 1482.28,9090.55 h78.74
  text "A" at 3769.68,9086.61 h78.74
  text "A" at 3175.2,9070.87 h78.74
  text "A" at 3214.57,9070.87 h78.74
  text "E" at 2697.24,9057.87 h78.74
  text "E" at 2797.24,9057.87 h78.74
  text "A" at 1698.82,9055.12 h78.74
  text "A" at 6080.71,9039.37 h78.74
  text "K" at 4551.18,9033.46 h78.74
  text "K" at 4738.19,9033.46 h78.74
  text "A" at 5757.87,9031.5 h78.74
  text "A" at 6525.59,9029.53 h78.74
  text "H" at 283.46,9023.62 h78.74
  text "H" at 448.82,9023.62 h78.74
  text "H" at 614.17,9023.62 h78.74
  text "H" at 779.53,9023.62 h78.74
  text "H" at 944.88,9023.62 h78.74
  text "A" at 6021.65,9011.81 h78.74
  text "T" at 5683.07,9003.94 h78.74
  text "A" at 1289.37,8996.06 h78.74
  text "T" at 2375.98,8984.25 h78.74
  text "T" at 6509.84,8984.25 h78.74
  text "T" at 1923.23,8974.41 h78.74
  text "T" at 1175.2,8964.57 h78.74
  text "A" at 1773.62,8958.66 h78.74
  text "E" at 2697.24,8957.87 h78.74
  text "E" at 2797.24,8957.87 h78.74
  text "A" at 5970.47,8948.82 h78.74
  text "B" at 2435.04,8944.88 h78.74
  text "A" at 6525.59,8933.07 h78.74
  text "A" at 1442.91,8929.13 h78.74
  text "A" at 6332.68,8929.13 h78.74
  text "A" at 5970.47,8905.51 h78.74
  text "A" at 5915.35,8889.76 h78.74
  text "A" at 1175.2,8885.83 h78.74
  text "B" at 1224.41,8885.83 h78.74
  text "A" at 5836.61,8881.89 h78.74
  text "T" at 4393.7,8875.98 h78.74
  text "A" at 1663.39,8874.02 h78.74
  text "A" at 4576.77,8874.02 h78.74
  text "A" at 5139.76,8866.14 h78.74
  text "A" at 1718.5,8862.2 h78.74
  text "A" at 4931.1,8862.2 h78.74
  text "E" at 2697.24,8857.87 h78.74
  text "E" at 2797.24,8857.87 h78.74
  text "A" at 6525.59,8856.3 h78.74
  text "A" at 6080.71,8854.33 h78.74
  text "A" at 1785.43,8846.46 h78.74
  text "T" at 3055.12,8846.46 h78.74
  text "T" at 5092.52,8846.46 h78.74
  text "A" at 5856.3,8846.46 h78.74
  text "A" at 5887.8,8822.83 h78.74
  text "A" at 5045.28,8818.9 h78.74
  text "A" at 5305.12,8818.9 h78.74
  text "A" at 5470.47,8818.9 h78.74
  text "A" at 6080.71,8814.96 h78.74
  text "A" at 4887.8,8811.02 h78.74
  text "H" at 283.46,8807.09 h78.74
  text "H" at 448.82,8807.09 h78.74
  text "H" at 614.17,8807.09 h78.74
  text "H" at 779.53,8807.09 h78.74
  text "H" at 944.88,8807.09 h78.74
  text "A" at 4714.57,8807.09 h78.74
  text "T" at 6509.84,8807.09 h78.74
  text "A" at 5596.46,8803.15 h78.74
  text "A" at 1450.79,8795.28 h78.74
  text "A" at 5974.41,8779.53 h78.74
  text "A" at 4505.91,8767.72 h78.74
  text "R" at 5909.45,8767.72 h78.74
  text "E" at 2697.24,8757.87 h78.74
  text "E" at 2797.24,8757.87 h78.74
  text "A" at 2021.65,8755.91 h78.74
  text "A" at 6525.59,8755.91 h78.74
  text "A" at 1419.29,8751.97 h78.74
  text "A" at 1828.74,8744.09 h78.74
  text "A" at 4777.56,8740.16 h78.74
  text "A" at 3045.28,8728.35 h78.74
  text "A" at 1903.54,8724.41 h78.74
  text "A" at 5757.87,8720.47 h78.74
  text "A" at 6387.8,8716.54 h78.74
  text "A" at 4194.88,8704.72 h78.74
  text "T" at 3104.33,8698.82 h78.74
  text "A" at 4364.17,8692.91 h78.74
  text "A" at 5903.54,8692.91 h78.74
  text "A" at 6080.71,8688.98 h78.74
  text "A" at 5053.15,8681.1 h78.74
  text "A" at 5360.24,8673.23 h78.74
  text "A" at 5757.87,8669.29 h78.74
  text "A" at 6525.59,8669.29 h78.74
  text "A" at 1844.49,8665.35 h78.74
  text "A" at 3045.28,8661.42 h78.74
  text "E" at 2697.24,8657.87 h78.74
  text "E" at 2797.24,8657.87 h78.74
  text "T" at 3970.47,8649.61 h78.74
  text "A" at 616.14,8645.67 h78.74
  text "A" at 694.88,8645.67 h78.74
  text "A" at 777.56,8645.67 h78.74
  text "A" at 1596.46,8645.67 h78.74
  text "A" at 4383.86,8645.67 h78.74
  text "A" at 4588.58,8633.86 h78.74
  text "A" at 5446.85,8633.86 h78.74
  text "B" at 1401.57,8629.92 h78.74
  text "A" at 5104.33,8629.92 h78.74
  text "T" at 1667.32,8620.08 h78.74
  text "T" at 6509.84,8620.08 h78.74
  text "A" at 3844.49,8614.17 h78.74
  text "A" at 6068.9,8614.17 h78.74
  text "A" at 4383.86,8606.3 h78.74
  text "A" at 4683.07,8598.43 h78.74
  text "E" at 2138.19,8590.55 h78.74
  text "E" at 2238.19,8590.55 h78.74
  text "E" at 2338.19,8590.55 h78.74
  text "T" at 2464.57,8590.55 h78.74
  text "A" at 616.14,8586.61 h78.74
  text "A" at 694.88,8586.61 h78.74
  text "A" at 777.56,8586.61 h78.74
  text "A" at 3679.13,8586.61 h78.74
  text "A" at 3844.49,8574.8 h78.74
  text "A" at 6525.59,8572.83 h78.74
  text "A" at 1864.17,8570.87 h78.74
  text "A" at 6273.62,8570.87 h78.74
  text "A" at 4328.74,8566.93 h78.74
  text "A" at 4895.67,8566.93 h78.74
  text "B" at 1460.63,8561.02 h78.74
  text "B" at 1549.21,8561.02 h78.74
  text "A" at 5470.47,8559.06 h78.74
  text "E" at 2697.24,8557.87 h78.74
  text "E" at 2797.24,8557.87 h78.74
  text "A" at 2017.72,8547.24 h78.74
  text "T" at 6116.14,8541.34 h78.74
  text "T" at 1696.85,8531.5 h78.74
  text "A" at 1942.91,8531.5 h78.74
  text "A" at 4584.65,8531.5 h78.74
  text "A" at 616.14,8527.56 h78.74
  text "A" at 694.88,8527.56 h78.74
  text "A" at 777.56,8527.56 h78.74
  text "A" at 5139.76,8523.62 h78.74
  text "T" at 3104.33,8521.65 h78.74
  text "A" at 3045.28,8519.68 h78.74
  text "A" at 4750,8519.68 h78.74
  text "A" at 5868.11,8519.68 h78.74
  text "A" at 4001.97,8511.81 h78.74
  text "A" at 4080.71,8511.81 h78.74
  text "T" at 4816.93,8511.81 h78.74
  text "T" at 5003.94,8511.81 h78.74
  text "T" at 6342.52,8511.81 h78.74
  text "A" at 4568.9,8496.06 h78.74
  text "T" at 3596.46,8492.13 h78.74
  text "A" at 6525.59,8492.13 h78.74
  text "M" at 348.43,8472.64 h78.74
  text "T" at 4610.24,8472.44 h78.74
  text "A" at 3801.18,8460.63 h78.74
  text "A" at 3848.43,8460.63 h78.74
  text "E" at 2697.24,8457.87 h78.74
  text "E" at 2797.24,8457.87 h78.74
  text "T" at 6509.84,8442.91 h78.74
  text "D" at 816.93,8433.07 h78.74
  text "D" at 895.67,8433.07 h78.74
  text "A" at 4541.34,8425.2 h78.74
  text "T" at 4137.8,8413.39 h78.74
  text "A" at 4253.94,8413.39 h78.74
  text "T" at 5564.96,8413.39 h78.74
  text "A" at 6124.02,8409.45 h78.74
  text "A" at 6525.59,8395.67 h78.74
  text "B" at 5190.94,8393.7 h78.74
  text "B" at 5269.69,8393.7 h78.74
  text "A" at 3588.58,8381.89 h78.74
  text "A" at 5124.02,8381.89 h78.74
  text "A" at 4952.76,8375.98 h78.74
  text "A" at 4631.89,8374.02 h78.74
  text "A" at 3852.36,8370.08 h78.74
  text "A" at 4742.13,8370.08 h78.74
  text "A" at 6049.21,8362.2 h78.74
  text "E" at 2697.24,8357.87 h78.74
  text "E" at 2797.24,8357.87 h78.74
  text "A" at 6624.02,8338.58 h78.74
  text "A" at 4049.21,8330.71 h78.74
  text "A" at 1108.27,8318.9 h78.74
  text "A" at 1155.51,8318.9 h78.74
  text "A" at 1198.82,8318.9 h78.74
  text "E" at 2138.19,8314.96 h78.74
  text "E" at 2238.19,8314.96 h78.74
  text "E" at 2338.19,8314.96 h78.74
  text "R" at 6066.93,8314.96 h78.74
  text "A" at 4387.8,8311.02 h78.74
  text "A" at 1438.98,8291.34 h78.74
  text "A" at 1501.97,8291.34 h78.74
  text "A" at 1564.96,8291.34 h78.74
  text "A" at 1631.89,8291.34 h78.74
  text "A" at 4242.13,8283.46 h78.74
  text "A" at 1108.27,8279.53 h78.74
  text "A" at 1155.51,8279.53 h78.74
  text "A" at 1198.82,8279.53 h78.74
  text "A" at 3757.87,8275.59 h78.74
  text "B" at 3114.17,8265.75 h78.74
  text "B" at 3183.07,8265.75 h78.74
  text "T" at 3350.39,8265.75 h78.74
  text "T" at 3448.82,8265.75 h78.74
  text "D" at 446.85,8251.97 h78.74
  text "A" at 3253.94,8248.03 h78.74
  text "T" at 2464.57,8246.06 h78.74
  text "R" at 6253.94,8246.06 h78.74
  text "A" at 3588.58,8244.09 h78.74
  text "A" at 1108.27,8240.16 h78.74
  text "A" at 1155.51,8240.16 h78.74
  text "A" at 1198.82,8240.16 h78.74
  text "A" at 3860.24,8236.22 h78.74
  text "A" at 5816.93,8220.47 h78.74
  text "A" at 5931.1,8220.47 h78.74
  text "A" at 4246.06,8216.54 h78.74
  text "A" at 2057.09,8212.6 h78.74
  text "A" at 6561.02,8212.6 h78.74
  text "A" at 6643.7,8212.6 h78.74
  text "T" at 3537.4,8196.85 h78.74
  text "A" at 4076.77,8196.85 h78.74
  text "K" at 919.29,8187.01 h78.74
  text "A" at 6167.32,8185.04 h78.74
  text "D" at 1155.51,8181.1 h78.74
  text "A" at 5651.57,8181.1 h78.74
  text "A" at 4289.37,8177.17 h78.74
  text "A" at 76.77,8173.23 h78.74
  text "A" at 135.83,8173.23 h78.74
  text "A" at 198.82,8173.23 h78.74
  text "D" at 446.85,8161.42 h78.74
  text "A" at 4076.77,8157.48 h78.74
  text "A" at 4242.13,8145.67 h78.74
  text "E" at 4374.02,8139.37 h78.74
  text "E" at 4474.02,8139.37 h78.74
  text "E" at 4574.02,8139.37 h78.74
  text "E" at 4674.02,8139.37 h78.74
  text "E" at 4774.02,8139.37 h78.74
  text "E" at 4874.02,8139.37 h78.74
  text "E" at 4974.02,8139.37 h78.74
  text "E" at 5074.02,8139.37 h78.74
  text "E" at 5174.02,8139.37 h78.74
  text "E" at 5274.02,8139.37 h78.74
  text "A" at 1340.55,8129.92 h78.74
  text "A" at 3738.19,8129.92 h78.74
  text "A" at 4076.77,8118.11 h78.74
  text "A" at 6340.55,8118.11 h78.74
  text "A" at 76.77,8114.17 h78.74
  text "A" at 135.83,8114.17 h78.74
  text "A" at 198.82,8114.17 h78.74
  text "K" at 1903.54,8108.27 h78.74
  text "K" at 2139.76,8108.27 h78.74
  text "R" at 5820.87,8108.27 h78.74
  text "M" at 348.43,8098.23 h78.74
  text "A" at 3285.43,8098.43 h78.74
  text "A" at 6572.83,8090.55 h78.74
  text "A" at 3159.45,8078.74 h78.74
  text "A" at 4246.06,8078.74 h78.74
  text "A" at 3482.28,8074.8 h78.74
  text "A" at 3864.17,8074.8 h78.74
  text "A" at 907.48,8066.93 h78.74
  text "A" at 946.85,8066.93 h78.74
  text "A" at 990.16,8066.93 h78.74
  text "A" at 3627.95,8066.93 h78.74
  text "A" at 6340.55,8059.06 h78.74
  text "A" at 76.77,8055.12 h78.74
  text "A" at 135.83,8055.12 h78.74
  text "A" at 198.82,8055.12 h78.74
  text "R" at 5633.86,8049.21 h78.74
  text "E" at 4374.02,8039.37 h78.74
  text "E" at 4474.02,8039.37 h78.74
  text "E" at 4574.02,8039.37 h78.74
  text "E" at 4674.02,8039.37 h78.74
  text "E" at 4774.02,8039.37 h78.74
  text "E" at 4874.02,8039.37 h78.74
  text "E" at 4974.02,8039.37 h78.74
  text "E" at 5074.02,8039.37 h78.74
  text "E" at 5174.02,8039.37 h78.74
  text "E" at 5274.02,8039.37 h78.74
  text "A" at 5832.68,8039.37 h78.74
  text "A" at 6163.39,8039.37 h78.74
  text "A" at 907.48,8027.56 h78.74
  text "A" at 946.85,8027.56 h78.74
  text "A" at 990.16,8027.56 h78.74
  text "A" at 1718.5,8019.69 h78.74
  text "A" at 525.59,8015.75 h78.74
  text "A" at 588.58,8015.75 h78.74
  text "A" at 659.45,8015.75 h78.74
  text "A" at 730.32,8015.75 h78.74
  text "A" at 801.18,8015.75 h78.74
  text "A" at 1395.67,8015.75 h78.74
  text "A" at 6005.91,8011.81 h78.74
  text "T" at 4068.9,8000 h78.74
  text "A" at 5966.54,8000 h78.74
  text "A" at 6478.35,8000 h78.74
  text "A" at 4017.72,7996.06 h78.74
  text "A" at 1868.11,7992.13 h78.74
  text "A" at 1816.93,7988.19 h78.74
  text "A" at 6340.55,7988.19 h78.74
  text "A" at 907.48,7984.25 h78.74
  text "A" at 946.85,7984.25 h78.74
  text "A" at 990.16,7984.25 h78.74
  text "A" at 5190.94,7984.25 h78.74
  text "A" at 5655.51,7984.25 h78.74
  text "A" at 1596.46,7964.57 h78.74
  text "A" at 525.59,7952.76 h78.74
  text "A" at 588.58,7952.76 h78.74
  text "A" at 659.45,7952.76 h78.74
  text "A" at 730.32,7952.76 h78.74
  text "A" at 801.18,7952.76 h78.74
  text "A" at 3604.33,7952.76 h78.74
  text "T" at 2061.02,7950.79 h78.74
  text "T" at 2198.82,7950.79 h78.74
  text "R" at 5633.86,7940.94 h78.74
  text "A" at 4242.13,7929.13 h78.74
  text "E" at 2503.94,7912.99 h78.74
  text "E" at 2603.94,7912.99 h78.74
  text "E" at 2703.94,7912.99 h78.74
  text "E" at 2803.94,7912.99 h78.74
  text "E" at 2903.94,7912.99 h78.74
  text "E" at 3003.94,7912.99 h78.74
  text "E" at 3103.94,7912.99 h78.74
  text "E" at 3203.94,7912.99 h78.74
  text "E" at 3303.94,7912.99 h78.74
  text "E" at 3403.94,7912.99 h78.74
  text "A" at 6340.55,7901.57 h78.74
  text "A" at 525.59,7889.76 h78.74
  text "A" at 588.58,7889.76 h78.74
  text "A" at 659.45,7889.76 h78.74
  text "A" at 730.32,7889.76 h78.74
  text "A" at 801.18,7889.76 h78.74
  text "A" at 4537.4,7885.83 h78.74
  text "A" at 6005.91,7858.27 h78.74
  text "R" at 6175.2,7852.36 h78.74
  text "E" at 1439.37,7832.68 h78.74
  text "E" at 1539.37,7832.68 h78.74
  text "E" at 1639.37,7832.68 h78.74
  text "A" at 2033.46,7826.77 h78.74
  text "A" at 525.59,7822.83 h78.74
  text "A" at 588.58,7822.83 h78.74
  text "A" at 659.45,7822.83 h78.74
  text "A" at 730.32,7822.83 h78.74
  text "A" at 801.18,7822.83 h78.74
  text "A" at 4289.37,7822.83 h78.74
  text "A" at 4116.14,7814.96 h78.74
  text "E" at 2503.94,7812.99 h78.74
  text "E" at 2603.94,7812.99 h78.74
  text "E" at 2703.94,7812.99 h78.74
  text "E" at 2803.94,7812.99 h78.74
  text "E" at 2903.94,7812.99 h78.74
  text "E" at 3003.94,7812.99 h78.74
  text "E" at 3103.94,7812.99 h78.74
  text "E" at 3203.94,7812.99 h78.74
  text "E" at 3303.94,7812.99 h78.74
  text "E" at 3403.94,7812.99 h78.74
  text "K" at 5328.74,7812.99 h78.74
  text "K" at 5486.22,7812.99 h78.74
  text "A" at 6435.04,7807.09 h78.74
  text "A" at 1824.8,7775.59 h78.74
  text "K" at 4216.54,7773.62 h78.74
  text "A" at 2202.76,7771.65 h78.74
  text "A" at 525.59,7767.72 h78.74
  text "A" at 588.58,7767.72 h78.74
  text "A" at 659.45,7767.72 h78.74
  text "A" at 730.32,7767.72 h78.74
  text "A" at 801.18,7767.72 h78.74
  text "A" at 5734.25,7748.03 h78.74
  text "A" at 2809.06,7732.28 h78.74
  text "A" at 3438.98,7728.35 h78.74
  text "A" at 3230.32,7724.41 h78.74
  text "A" at 1730.32,7720.47 h78.74
  text "A" at 525.59,7708.66 h78.74
  text "A" at 588.58,7708.66 h78.74
  text "A" at 659.45,7708.66 h78.74
  text "A" at 730.32,7708.66 h78.74
  text "A" at 801.18,7708.66 h78.74
  text "A" at 4454.72,7696.85 h78.74
  text "A" at 4561.02,7696.85 h78.74
  text "A" at 4675.2,7696.85 h78.74
  text "A" at 4785.43,7696.85 h78.74
  text "A" at 4364.17,7694.88 h78.74
  text "A" at 3438.98,7688.98 h78.74
  text "A" at 5190.94,7688.98 h78.74
  text "R" at 5820.87,7685.04 h78.74
  text "A" at 5895.67,7685.04 h78.74
  text "A" at 5986.22,7685.04 h78.74
  text "P" at 210.63,7665.35 h78.74
  text "A" at 1773.62,7665.35 h78.74
  text "A" at 3230.32,7665.35 h78.74
  text "P" at 3832.68,7665.35 h78.74
  text "P" at 6559.06,7665.35 h78.74
  text "A" at 6143.7,7661.42 h78.74
  text "A" at 1883.86,7657.48 h78.74
  text "A" at 1923.23,7657.48 h78.74
  text "A" at 5194.88,7649.61 h78.74
  text "A" at 6387.8,7649.61 h78.74
  text "A" at 2372.05,7645.67 h78.74
  text "A" at 5714.57,7641.73 h78.74
  text "A" at 4305.12,7637.8 h78.74
  text "A" at 3667.32,7622.05 h78.74
  text "A" at 3242.13,7618.11 h78.74
  text "A" at 6214.57,7598.43 h78.74
  text "E" at 1439.37,7596.46 h78.74
  text "E" at 1539.37,7596.46 h78.74
  text "E" at 1639.37,7596.46 h78.74
  text "A" at 2958.66,7590.55 h78.74
  text "K" at 3478.35,7586.61 h78.74
  text "A" at 2391.73,7582.68 h78.74
  text "A" at 5588.58,7582.68 h78.74
  text "A" at 5899.61,7582.68 h78.74
  text "A" at 6167.32,7582.68 h78.74
  text "K" at 437.01,7566.93 h78.74
  text "A" at 2202.76,7559.06 h78.74
  text "A" at 1824.8,7555.12 h78.74
  text "B" at 2474.41,7547.24 h78.74
  text "B" at 2553.15,7547.24 h78.74
  text "A" at 2970.47,7547.24 h78.74
  text "A" at 6167.32,7539.37 h78.74
  text "A" at 4387.8,7527.56 h78.74
  text "E" at 4570.87,7509.45 h78.74
  text "E" at 4670.87,7509.45 h78.74
  text "E" at 4770.87,7509.45 h78.74
  text "E" at 4870.87,7509.45 h78.74
  text "E" at 4970.87,7509.45 h78.74
  text "E" at 5070.87,7509.45 h78.74
  text "E" at 5170.87,7509.45 h78.74
  text "E" at 5270.87,7509.45 h78.74
  text "E" at 5370.87,7509.45 h78.74
  text "E" at 5470.87,7509.45 h78.74
  text "A" at 6057.09,7500 h78.74
  text "T" at 3704.72,7498.03 h78.74
  text "A" at 2868.11,7496.06 h78.74
  text "A" at 2171.26,7476.38 h78.74
  text "A" at 3159.45,7464.57 h78.74
  text "A" at 2104.33,7456.69 h78.74
  text "A" at 6025.59,7456.69 h78.74
  text "K" at 5791.34,7448.82 h78.74
  text "A" at 3553.15,7425.2 h78.74
  text "A" at 2675.2,7421.26 h78.74
  text "A" at 2104.33,7417.32 h78.74
  text "A" at 3395.67,7409.45 h78.74
  text "E" at 4570.87,7409.45 h78.74
  text "E" at 4670.87,7409.45 h78.74
  text "E" at 4770.87,7409.45 h78.74
  text "E" at 4870.87,7409.45 h78.74
  text "E" at 4970.87,7409.45 h78.74
  text "E" at 5070.87,7409.45 h78.74
  text "E" at 5170.87,7409.45 h78.74
  text "E" at 5270.87,7409.45 h78.74
  text "E" at 5370.87,7409.45 h78.74
  text "E" at 5470.87,7409.45 h78.74
  text "A" at 1996.06,7401.57 h78.74
  text "A" at 2600.39,7397.64 h78.74
  text "A" at 3553.15,7385.83 h78.74